# Altium PCB GripperTopBoard.PcbDoc (part 1 of 2)
Units mil, origin at the board's own origin, x right, y up, seen from the top; angles counter-clockwise.
Board outline 3129.83 x 3346.46 mil, 2 copper layers (Top Layer, Bottom Layer), stack 57 mil thick; 36 components, 15 nets, 87 pads, 97 vias.
Unrouted connection lines stored in the file: 53.
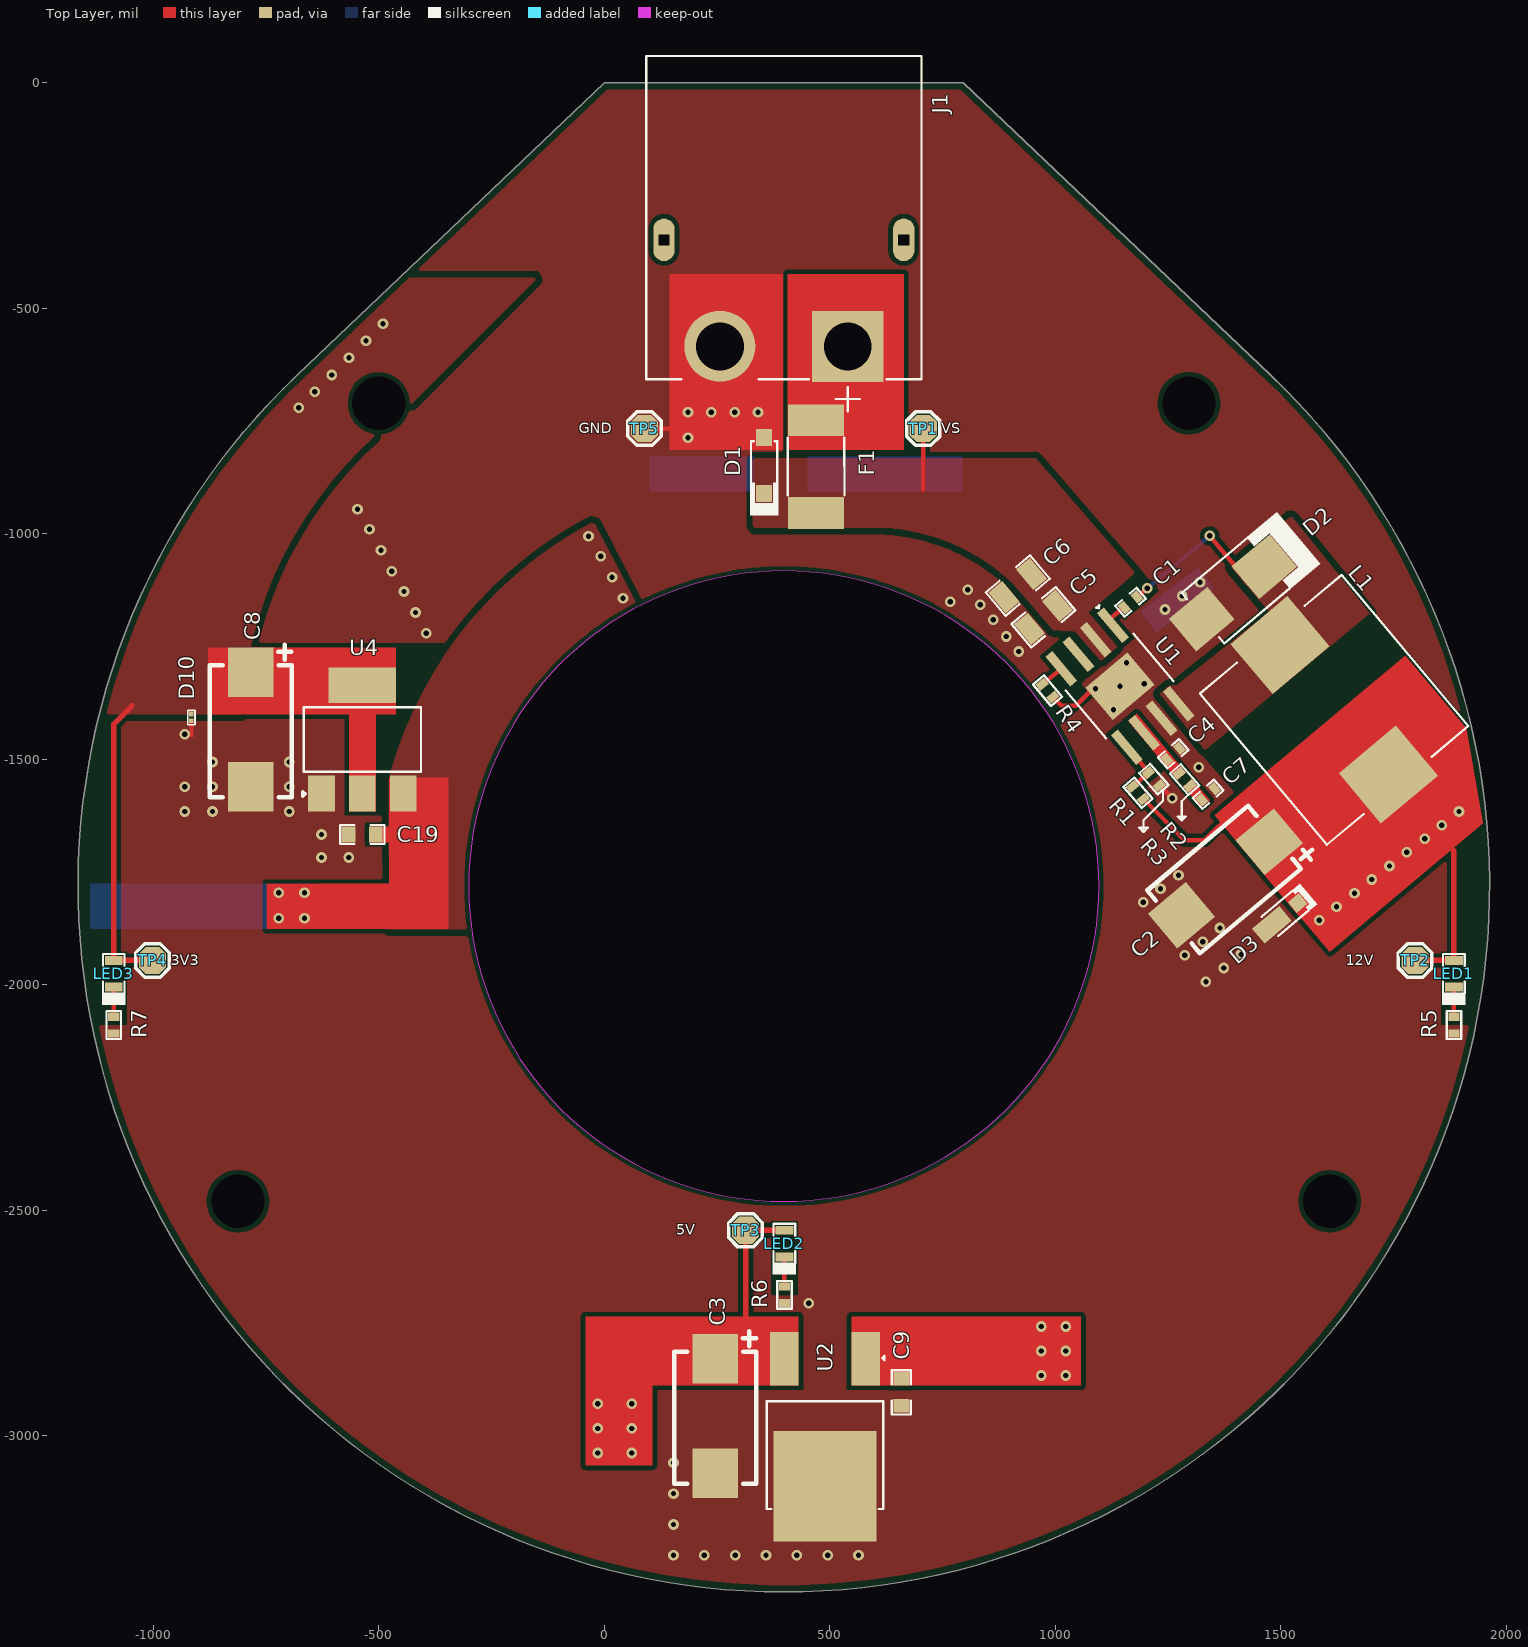
[diagram p0: Top Layer view]
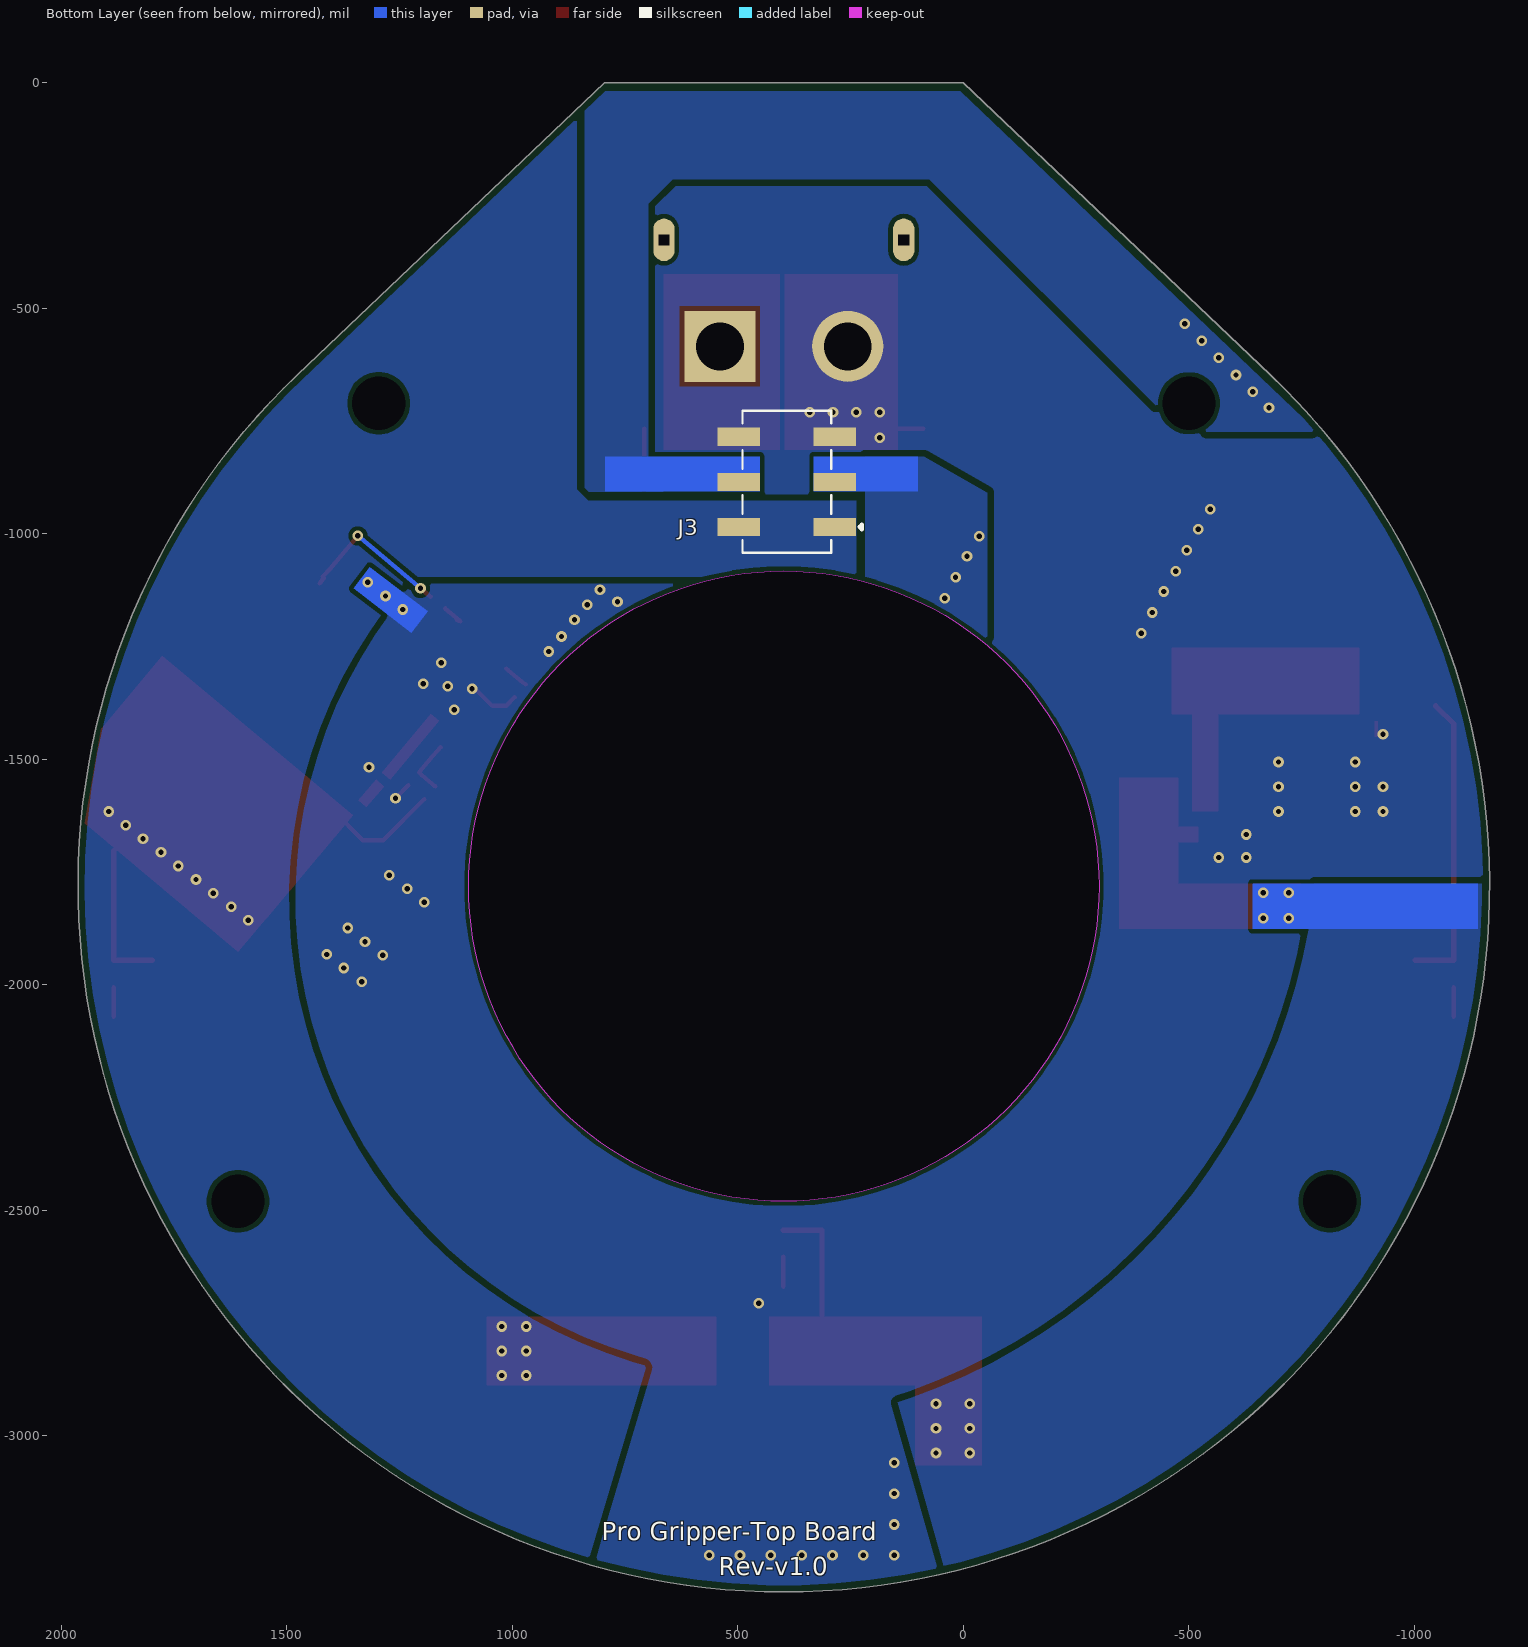
[diagram p1: Bottom Layer view, seen from below]

## Layer stack, top to bottom
Top Solder: solder mask 3, Solder Resist, Dk 3.5
Top Layer: signal copper 10
Dielectric 1: core 37, FR-4, Dk 4.8
Bottom Layer: signal copper 10
Bottom Solder: solder mask 3, Solder Resist, Dk 3.5

## Board outline
-680.82,-647.5 ccw(c397.67,-1781.5) 1476.17,-647.5 795.35,0 0,0
cut-out: -301.15,-1781.5 ccw(c397.67,-1781.5) 397.67,-2480.32 ccw(c397.67,-1781.5) 1096.49,-1781.5 ccw(c397.67,-1781.5) 397.67,-1082.68 ccw(c397.67,-1781.5)

## Design rules (kind name [scope] priority, off if disabled: settings)
BoardOutlineClearance [All] p1: gap=0 ignorepadtopadclearanceinfootprint=FALSE except(15: Poly-OutlineEdge)
Clearance D10 [InComponent('D10')] p1: gap=10 ignorepadtopadclearanceinfootprint=TRUE except(4: Track-SMDPad Track-Fill Track-Poly Track-Region SMDPad-Fill SMDPad-Poly; 15: Poly-Poly)
Clearance [All] p2: gap=10 ignorepadtopadclearanceinfootprint=TRUE except(15: Poly-Poly)
HoleSize [All] p1: absolutevalues=TRUE maxlimit=118.11 minlimit=1 maxpercent=80.000 minpercent=20.000
MinimumSolderMaskSliver [All] p1: minsoldermaskwidth=0
PolygonConnect [All] p1: connectstyle=Direct reliefconductorwidth=10 reliefentries=4 polygonreliefangle="90 Angle" airgapwidth=10
RoutingVias [All] p1: holewidth=11.81 width=23.62 viastyle="Through Hole" minholewidth=11.81 minwidth=23.62 maxholewidth=11.81 maxwidth=23.62
SilkToSilkClearance [All] p1: silktosilkclearance=0
SilkToSolderMaskClearance [IsPad] p1: minsilkscreentomaskgap=0 clearancetoexposedcopper=TRUE
SolderMaskExpansion Via [isvia] p1: expansion=4 istentingtop=TRUE
SolderMaskExpansion [All] p2: expansion=4 istentingtop=FALSE
SupplyNets "Schematic Supply Nets_4" [InNet('VS')] p1: voltage=0.000
SupplyNets "Schematic Supply Nets_3" [InNet('GND')] p2: voltage=0.000
SupplyNets "Schematic Supply Nets_2" [InNet('+3V3')] p3: voltage=0.000
SupplyNets "Schematic Supply Nets_1" [InNet('+5V')] p4: voltage=0.000
SupplyNets "Schematic Supply Nets" [InNet('+12V')] p5: voltage=0.000
UnRoutedNet [All] p1: checkbadconnections=TRUE
Width [All] p1: maxlimit=20 minlimit=10 preferedwidth=10 minimp=50.000000 maximp=50.000000 favimp=50.000000
25 further rules are at their usual default settings.

## Classes and differential pairs
component class U_Connector-Sheet: C J3

## Components (designator, comment, footprint, x,y, rotation, side; value= is the part's Value field where it differs from the comment)
C1 "100nF" cap-0402 1166.41,-1151.97 r220 top
C2 "100uF" Case-E 1473.95,-1682.92 r220 top
C3 "100uF" Case-E 245.99,-2829.37 r270 top
C4 "6.8pF" Cap-0402 1260.99,-1487.92 r221 top
C5 "2.2uF" Cap-0805 973.32,-1185.27 r40 top
C6 "2.2uF" Cap-0805 916.36,-1115.12 r40 top
C7 "3.3nf" Cap-0402 1338.44,-1577.75 r221 top
C8 "100uF" Case-E -784,-1307.46 r270 top
C9 "1uF" Cap-0603 658,-2904 r90 top
C19 "1uF" Cap-0603 -537,-1667 r0 top
D1 "AZ4036-01G" SOD-123 354,-849 r270 top
D2 "SS510B" SMB_ 1393.78,-1131.3 r40 top
D3 "MSMP12A-M3/89A" MicroSMP 1508.5,-1842.94 r40 top
D10 "ESDM2033MX4T5G" DFN-2(0.3x0.6) -915.87,-1407.25 r90 top
F1 "1812L075/48GR" 1812-FUSE 469.41,-851.16 r270 top
J1 "XT60PW-M" XT60PW-M 397.67,-466.54 r270 top locked
J3 "DW254S-22-06-85" "HDR 2x3 (Female SMD 2.54mm)" 390.87,-885 r0 bottom
L1 "22uH" YSPI1040TP-220M 1617.94,-1390.54 r310 top locked
LED1 "RED" LED-0603 1883.47,-1975.69 r270 top
LED2 "RED" LED-0603 399,-2574 r270 top
LED3 "RED" LED-0603 -1088,-1975.69 r270 top
R1 "147K" Res-0402 1182.87,-1574.41 r311 top value=147kR
R2 "28.7K" Res-0402 1286.08,-1545.19 r131 top
R3 "10.5K" Res-0402 1218.05,-1544.18 r131 top
R4 "249K" Res-0402 982.26,-1347.95 r130 top
R5 "1K" Res-0402 1883.47,-2089.5 r270 top
R6 "240R" Res-0402 399,-2687.81 r270 top
R7 "100R" Res-0402 -1088,-2089.5 r270 top
TP1 "TEST POINT" Test-point 706.77,-767.01 r0 top
TP2 "TEST POINT" Test-point 1797.47,-1946.16 r0 top
TP3 "TEST POINT" Test-point 313,-2544.47 r0 top
TP4 "TEST POINT" Test-point -1002,-1946.16 r90 top
TP5 "TEST POINT" Test-point 88.59,-767 r0 top
U1 "TPS54560BQDDARQ1" "8-SO PowerPad" 1143,-1338.3 r310 top
U2 "MC7805BDTRKG" DPAK_ 488.99,-2970.71 r180 top
U4 "LDL1117S33R" "SOT- 223" -537,-1456 r0 top

## Footprints (in the part's own frame and the unit in brackets; to place one, negate y for a bottom-side part, rotate by r counter-clockwise, add the part's x,y. Pads: shape width x height; smd on the part's side, far side on the other; paste and mask are expansions set on the pad)
"8-SO PowerPad" [mm]
  rect 2.2x0.5 smd mask+0.07: 1(-2.875,1.905) 2(-2.875,0.635) 3(-2.875,-0.635) 4(-2.875,-1.905) 5(2.875,-1.905) 6(2.875,-0.635) 7(2.875,0.635) 8(2.875,1.905)
  rect 2.4x3.1 smd mask+0.07: 9(0,0)
  silkscreen extent -4.24,-2.49 1.73,2.49, body extent -3,-2.45 3,2.45, height 1.7
1812-FUSE [mm] "13.2V 2.6A 40A 800mW -40?~+85? 5.2A 10mO 2.5s 50mO 1812 Resettable Fuses ROHS"
  rect 1.78x3.15 smd mask+0.05: 1(-2.615,0) 2(2.615,0)
  silkscreen extent -1.63,-1.6 1.63,1.6, body extent -2.27,-1.62 2.27,1.62, height 0.85
cap-0402 [mil]
  rect 18x25 smd mask+2.36: 1(-18.5,0) 2(18.5,0)
  silkscreen extent -31,-16 31,16, body extent -20,-10 20,10, height 19
Cap-0402 [mil]
  rect 18x25 smd mask+2.36: 1(-18.5,0) 2(18.5,0)
  silkscreen extent -31,-16 31,16, body extent -20,-10 20,10, height 19
Cap-0603 [mil]
  rect 30x35 smd mask+2.36: 1(-30,0) 2(30,0)
  silkscreen extent -49,-21 49,21, body extent -32,-16 31,16, height 34
Cap-0805 [mil] "SMD 0805"
  rect 40x60 smd mask+2.76: 1(-40,0) 2(40,0)
  silkscreen extent -64,-34 64,34, body extent -39,-25 39,25, height 30
Case-E [mm]
  rect 2.79x2.57 smd: 1(0,0) 2(6.44,0)
  silkscreen extent -1.56,-2.31 7.03,2.31, body extent -0.27,-2.21 6.92,2.21, height 2.88
DFN-2(0.3x0.6) [mm]
  rect 0.27x0.26 smd mask+0.05: 1(-0.195,0) 2(0.195,0)
  silkscreen extent -0.41,-0.2 0.41,0.2, body extent -0.3,-0.15 0.3,0.15, height 0.3
DPAK_ [mm]
  rect 1.6x3 smd: 1(-2.285,-3.59) 3(2.285,-3.59)
  rect 5.8x6.2 smd: 2(0,3.59)
  silkscreen extent -3.35,-3.76 3.28,4.88, body extent -3.28,-3.99 3.22,5.92, height 2.51
"HDR 2x3 (Female SMD 2.54mm)" [mm]
  rect 2.4x1.02 smd paste+0 mask+0.05: 1(-2.704,2.54) 2(2.704,2.54) 3(-2.704,0) 4(2.704,0) 5(-2.704,-2.54) 6(2.704,-2.54)
  silkscreen extent -4.23,-4 2.5,4, body extent -3.55,-4.01 3.55,4.01, height 8.9
LED-0603 [mm]
  rect 0.5x1 smd: 1(-0.75,0) 2(0.75,0)
  silkscreen extent -1.12,-0.66 1.75,0.66, body extent -0.82,-0.37 0.82,0.36, height 0.68
MicroSMP [mm]
  rect 2x1.1 smd paste+0 mask+0.051: 1(-0.95,0)
  rect 0.8x0.8 smd paste+0 mask+0.051: 2(0.95,0)
  silkscreen extent -1.09,-0.76 1.75,0.76, body extent -1.25,-0.65 1.25,0.65, height 0.66
Res-0402 [mil]
  rect 18x25 smd mask+2.17: 1(-18.5,0) 2(18.5,0)
  silkscreen extent -32,-17 32,16, body extent -23,-11 23,11, height 16
SMB_ [mm]
  rect 2.8x2.4 smd: 1(-2.3,0) 2(2.3,0)
  silkscreen extent -2.21,-1.91 4.83,1.9, body extent -2.7,-1.8 2.7,1.8, height 2.3
SOD-123 [mm]
  rect 0.95x0.9 smd: 1(-1.575,0) 2(1.575,0)
  silkscreen extent -1.37,-0.8 2.82,0.8, body extent -1.82,-0.78 1.83,0.78, height 1.5
"SOT- 223" [mm]
  rect 1.5x2 smd: 1(-2.3,-3.05) 2(0,-3.05) 3(2.3,-3.05)
  rect 3.8x2 smd: 4(0,3.05)
  silkscreen extent -3.35,-3.2 3.3,1.8, body extent -3.25,-3.5 3.25,3.5, height 1.61
Test-point [mil]
  oct 60x60 smd: 1(0,0)
  silkscreen extent -37,-37 37,37
XT60PW-M [mm]
  rect 4x4 hole 2.7: 1(3,3.6)
  round 4 hole 2.7: 2(3,-3.6)
  oval 2.4x1.2 hole 0.6 square: S1(-3,6.75) S2(-3,-6.75)
  silkscreen extent -13.35,-7.75 6.65,7.75, body extent -13.35,-7.75 4.85,7.75, height 8.4
YSPI1040TP-220M [mm]
  rect 3.7x4.2 smd: 1(-4.75,0) 2(4.75,0)
  silkscreen extent -5.56,-5.2 5.56,5.2, body extent -5.5,-5.15 5.5,5.15, height 3.98

## Part data
C1: library part C1005X7R1H104KT000F, "CAP CER 0.1UF 50V X7R 0402", Dielectric=X7R, LCSC Part Number=C361198, Manufacturer=TDK, Tolerance=10%, Voltage=25V, Category="Ceramic Capacitors", ComponentLink1Description=LCSC, ComponentLink1URL=https://www.lcsc.com/product-detail/Multilayer-Ceramic-Capacitors-MLCC-SMD-SMT_TDK-C1005X7R1H104KT000F_C361198.html, Item Type=Capacitor, Manufacturer Part Number=C1005X7R1H104KT000F, RoHS=No, Supplier 1=Avnet, Supplier Part Number 1=C1005X7R1H104KT000F
C2 C3 C8: library part TAJE107M025RNJ, "CAP TANT 100UF 20% 25V 2917", Case Code (Imperial)=2917, Case Code (Metric)=7343, ESR (Equivalent Series Resistance)=300mR, LCSC Part Number=C7230, Leakage Current=25uA, Manufacturer="Kyocera AVX", Max Operating Temperature=125°C, Min Operating Temperature=-55°C, Package Quantity=1, Supplier Part Number 1=581-TAJE107M025RNJ, Tolerance=20%, Voltage Rating=25V, Capacitance=100uF, Case/Package=2917, Category="Tantalum Capacitors", ComponentLink1Description=https://datasheet.ciiva.com/26787/taje107m025rnj-26787048.pdf?src-supplier=IIIC, ComponentLink1URL=https://datasheet.ciiva.com/26787/taje107m025rnj-26787048.pdf?src-supplier=IIIC, ComponentLink2Description=https://datasheet.ciiva.com/265/taj-265541.pdf?src-supplier=Digi-Key, ComponentLink2URL=https://datasheet.ciiva.com/265/taj-265541.pdf?src-supplier=Digi-Key, ComponentLink3Description=https://datasheet.ciiva.com/265/taj-265542.pdf?src-supplier=Digi-Key, ComponentLink3URL=https://datasheet.ciiva.com/265/taj-265542.pdf?src-supplier=Digi-Key, ComponentLink4Description=https://datasheet.ciiva.com/265/taj-265540.pdf?src-supplier=Digi-Key, ComponentLink4URL=https://datasheet.ciiva.com/265/taj-265540.pdf?src-supplier=Digi-Key, ComponentLink5Description=https://datasheet.ciiva.com/28609/1719052-28609254.pdf?src-supplier=Element14, ComponentLink5URL=https://datasheet.ciiva.com/28609/1719052-28609254.pdf?src-supplier=Element14, ComponentLink6Description=https://datasheet.ciiva.com/11230/taj-11230456.pdf?src-supplier=Avnet, ComponentLink6URL=https://datasheet.ciiva.com/11230/taj-11230456.pdf?src-supplier=Avnet, ComponentLink7Description=https://datasheet.ciiva.com/17339/taj-17339677.pdf?src-supplier=Avnet+Europe, ComponentLink7URL=https://datasheet.ciiva.com/17339/taj-17339677.pdf?src-supplier=Avnet+Europe, ComponentLink8Description=https://datasheet.ciiva.com/22667/1719052-22667581.pdf?src-supplier=Element14, ComponentLink8URL=https://datasheet.ciiva.com/22667/1719052-22667581.pdf?src-supplier=Element14, Construction=Flat, Depth=4.3mm, Dissipation Factor=10%, Features="General Purpose", Height=4.3mm, Height - Seated (Max)=0.169inch, Lead Free="Lead Free", Length=7.3mm, Manufacturer Part Number=TAJE107M025RNJ, Mount="Surface Mount", Number of Pins=2, Packaging="Tape and Reel", Polarity=Polar, Pricing 1="1=2.81000, 10=2.81000, 50=2.81000, 100=2.19000, 1000=1.76000, 10000=1.76000 (USD)", Radiation Hardening=No, REACH SVHC="No SVHC", RoHS=Yes, RoHS Compliant=Yes, Series=TAJ, Stock 1=109, Supplier 1=Mouser, Termination=SMD/SMT, Voltage Rating (DC)=25V, Width=4.3mm
C4: library part CC0402CRNPO9BN6R8, "CAP CER 6.8PF 50V C0G/NPO 0402", Case Code (Imperial)=0402, Case Code (Metric)=1005, Dielectric=C0G, Insulation Resistance=10GR, LCSC Part Number=C189470, Manufacturer=Yageo, Max Operating Temperature=125°C, Min Operating Temperature=-55°C, Supplier Part Number=3247368, Tolerance=2%, Voltage Rating=50V, Case/Package=0402, Category="Ceramic Capacitors", ComponentLink1Description=https://datasheet.ciiva.com/11587/upy-gp-np0-16v-to-50v-8-11587182.pdf?src-supplier=Avnet, ComponentLink1URL=https://datasheet.ciiva.com/11587/upy-gp-np0-16v-to-50v-8-11587182.pdf?src-supplier=Avnet, Construction=Flat, Depth=0.5mm, Height=0.5mm, Item Type=Capacitor, Length=1mm, Manufacturer Part Number=CC0402CRNPO9BN6R8, Mounting Technology="Surface Mount", Packaging="Tape and Reel", Pricing="10000=0.0024, 40000=0.0022, 150000=0.0021, 400000=0.002, 1000000=0.0019 (USD)", Radiation Hardening=No, RoHS=Yes, RoHS Compliant=Yes, Series=CC, Stock=200000, Supplier="Future Electronics", Termination=SMD/SMT, Voltage Rating (DC)=50V, Weight=2.3E-05oz, Width=0.5mm
C5 C6: library part GRM21BD72A225KE01L, "CAP CER 2.2UF 100V X7T 0805", LCSC Part Number=C2981733, Manufacturer=Murata, Supplier Part Number 1=490-GRM21BD72A225KE01LCT-ND, Category="Ceramic Capacitors", ComponentLink1Description=LCSC, ComponentLink1URL=https://www.lcsc.com/product-detail/Multilayer-Ceramic-Capacitors-MLCC-SMD-SMT_Murata-Electronics-GRM21BD72A225KE01L_C2981733.html, Item Type=Capacitor, Manufacturer Part Number=GRM21BD72A225KE01L, Pricing 1="1=0.55000, 10=0.38600, 50=0.29220, 100=0.25440, 500=0.18846, 1000=0.16020 (USD)", RoHS=No, RoHS Compliant=Yes, Stock 1=2439, Supplier 1=Digi-Key
C7: library part CC0402KRX7R9BB332, "CAP CER 3.3nF 50V X7R 0402", Capacitance=3.3nF, Case Code (Imperial)=0402, Case Code (Metric)=1005, Dielectric=X7R, Dielectric Material=Ceramic, Insulation Resistance=100GR, LCSC Part Number=C107028, Manufacturer=Yageo, Max Operating Temperature=125°C, Min Operating Temperature=-55°C, Package Quantity=1, Supplier Part Number 1=9776550, Tolerance=10%, Voltage=50V, Case/Package=0402, Category="Ceramic Capacitors", ComponentLink1Description=https://datasheet.ciiva.com/144/mlccorderingcode-144014.pdf?src-supplier=Digi-Key, ComponentLink1URL=https://datasheet.ciiva.com/144/mlccorderingcode-144014.pdf?src-supplier=Digi-Key, ComponentLink2Description=https://datasheet.ciiva.com/144/mlccorderingcode-144013.pdf?src-supplier=Digi-Key, ComponentLink2URL=https://datasheet.ciiva.com/144/mlccorderingcode-144013.pdf?src-supplier=Digi-Key, ComponentLink3Description=https://datasheet.ciiva.com/144/mlccorderingcode-144015.pdf?src-supplier=Digi-Key, ComponentLink3URL=https://datasheet.ciiva.com/144/mlccorderingcode-144015.pdf?src-supplier=Digi-Key, ComponentLink4Description=https://datasheet.ciiva.com/11786/0900766b80d84f1d-11786153.pdf?src-supplier=Rs, ComponentLink4URL=https://datasheet.ciiva.com/11786/0900766b80d84f1d-11786153.pdf?src-supplier=Rs, ComponentLink5Description=https://datasheet.ciiva.com/7978/1489800-7978103.pdf?src-supplier=Element14, ComponentLink5URL=https://datasheet.ciiva.com/7978/1489800-7978103.pdf?src-supplier=Element14, ComponentLink6Description=https://datasheet.ciiva.com/28450/1489800-28450409.pdf?src-supplier=Element14, ComponentLink6URL=https://datasheet.ciiva.com/28450/1489800-28450409.pdf?src-supplier=Element14, ComponentLink7Description=https://datasheet.ciiva.com/5789/1489800-5789558.pdf?src-supplier=Farnell, ComponentLink7URL=https://datasheet.ciiva.com/5789/1489800-5789558.pdf?src-supplier=Farnell, ComponentLink8Description=https://datasheet.ciiva.com/8033/1489800-8033630.pdf?src-supplier=Element14, ComponentLink8URL=https://datasheet.ciiva.com/8033/1489800-8033630.pdf?src-supplier=Element14, ComponentLink9Description=https://datasheet.ciiva.com/22745/1489800-22745767.pdf?src-supplier=Element14, ComponentLink9URL=https://datasheet.ciiva.com/22745/1489800-22745767.pdf?src-supplier=Element14, ComponentLink10Description=https://datasheet.ciiva.com/5425/upy-gphc-x7r-6-3v-to-50v-8-12304-5425518.pdf?src-supplier=Mouser, ComponentLink10URL=https://datasheet.ciiva.com/5425/upy-gphc-x7r-6-3v-to-50v-8-12304-5425518.pdf?src-supplier=Mouser, ComponentLink11Description=https://datasheet.ciiva.com/11586/upy-gphc-x7r-6-3v-to-50v-8-11586486.pdf?src-supplier=Avnet, ComponentLink11URL=https://datasheet.ciiva.com/11586/upy-gphc-x7r-6-3v-to-50v-8-11586486.pdf?src-supplier=Avnet, ComponentLink12Description=https://datasheet.ciiva.com/15189/getdatasheetpartid-315557-15189133.pdf?src-supplier=Verical, ComponentLink12URL=https://datasheet.ciiva.com/15189/getdatasheetpartid-315557-15189133.pdf?src-supplier=Verical, Depth=0.5mm, Halogen Free="Halogen Free", Height=0.5mm, Item Type=Capacitor, Lead Free="Lead Free", Length=1mm, Manufacturer Part Number=CC0402KRX7R9BB332, Mount="Surface Mount", Number of Pins=2, Packaging="Tape and Reel", Pricing 1="10000=0.00230, 40000=0.00200, 50000=0.00220, 150000=0.00190, 250000=0.00200, 400000=0.00180, 1000000=0.00190, 2500000=0.00180 (USD)", Radiation Hardening=No, Reach SVHC Compliant=Yes, RoHS=Yes, RoHS Compliant=Yes, Series=CC, Stock 1=1190000, Supplier 1="Future Electronics", Terminal Length=0.225mm, Termination=SMD/SMT, Thickness=0.022inch, Voltage Rating=50V, Voltage Rating (DC)=50V, Width=0.02inch
C9 C19: library part CC0603KRX5R8BB105, "CAP CER 1UF 25V X5R 0603", Case Code (Imperial)=0603, Case Code (Metric)=1608, Dielectric=X5R, LCSC Part Number=C14664, Manufacturer=Yageo, Max Operating Temperature=85°C, Min Operating Temperature=-55°C, Package Quantity=1, Supplier Part Number 1=311-1445-1-ND, Tolerance=10%, Voltage Rating=25V, Capacitance=1uF, Case/Package=0603, Category="Ceramic Capacitors", ComponentLink1Description=https://datasheet.ciiva.com/176/mlccorderingcode-176785.pdf?src-supplier=Digi-Key, ComponentLink1URL=https://datasheet.ciiva.com/176/mlccorderingcode-176785.pdf?src-supplier=Digi-Key, ComponentLink2Description=https://datasheet.ciiva.com/176/mlccorderingcode-176786.pdf?src-supplier=Digi-Key, ComponentLink2URL=https://datasheet.ciiva.com/176/mlccorderingcode-176786.pdf?src-supplier=Digi-Key, ComponentLink3Description=https://datasheet.ciiva.com/176/mlccorderingcode-176787.pdf?src-supplier=Digi-Key, ComponentLink3URL=https://datasheet.ciiva.com/176/mlccorderingcode-176787.pdf?src-supplier=Digi-Key, ComponentLink4Description=https://datasheet.ciiva.com/17436/upy-gphc-x5r-4v-to-50v-12-17436952.pdf?src-supplier=Avnet+Europe, ComponentLink4URL=https://datasheet.ciiva.com/17436/upy-gphc-x5r-4v-to-50v-12-17436952.pdf?src-supplier=Avnet+Europe, ComponentLink5Description=https://datasheet.ciiva.com/7978/1525783-7978171.pdf?src-supplier=Element14, ComponentLink5URL=https://datasheet.ciiva.com/7978/1525783-7978171.pdf?src-supplier=Element14, ComponentLink6Description=https://datasheet.ciiva.com/11586/upy-gphc-x5r-4v-to-50v-12-11586318.pdf?src-supplier=Avnet, ComponentLink6URL=https://datasheet.ciiva.com/11586/upy-gphc-x5r-4v-to-50v-12-11586318.pdf?src-supplier=Avnet, Construction=Flat, Depth=0.8mm, Halogen Free="Halogen Free", Height=0.8mm, Item Type=Capacitor, Lead Free="Lead Free", Length=1.6mm, Manufacturer Part Number=CC0603KRX5R8BB105, Mount="Surface Mount", Number of Pins=2, Packaging="Tape and Reel", Pricing 1="1=0.12000, 10=0.08400, 50=0.04760, 100=0.03940, 500=0.02764, 1000=0.02288 (USD)", Radiation Hardening=No, REACH SVHC="No SVHC", RoHS=Yes, RoHS Compliant=Yes, Series=CC, Stock 1=919939, Supplier 1=Digi-Key, Termination=SMD/SMT, Thickness=0.035inch, Voltage Rating (DC)=25V, Width=0.031inch
D1: "Clamp Ipp Tvs Diode Surface Mount SOD-123", LCSC Part Number=-, Manufacturer=Amazing, Package=SOD-123, ComponentLink1Description=Digikey, ComponentLink1URL=https://www.digikey.com/en/products/detail/amazing/AZ4036-01G/16615419, Item Type=Diode, Manufacturer Part Number=AZ4036-01G
D2: "SCHOTTKY DIODE SMB 100V 5A", LCSC Part Number=C3011128, Manufacturer=MDD, Package=SMB, ComponentLink1Description=LCSC, ComponentLink1URL=https://www.lcsc.com/product-detail/Schottky-Barrier-Diodes-SBD_JUXING-SS510B_C3011128.html, Item Type=Diode, Manufacturer Part Number=SS510B
D3: "TVS DIODE 12VWM 19.9VC MICROSMP", LCSC Part Number=C1973858, Max Operating Temperature=150°C, Min Breakdown Voltage=13.3V, Min Operating Temperature=-55°C, Peak Pulse Current=7.5A, Peak Pulse Power=150W, Power Line Protection=No, Reverse Standoff Voltage=12V, Supplier Part Number=78-MSMP12A-M389A, Category="TVS Diodes", ComponentLink1Description=LCSC, ComponentLink2Description=http://www.vishay.com/docs/89457/mspm6a.pdf?src-supplier=Digi-Key, ComponentLink2URL=http://www.vishay.com/docs/89457/mspm6a.pdf?src-supplier=Digi-Key, ComponentLink3Description=http://www.vishay.com/docs/89457/msmp6athrumsmp20a.pdf?src-supplier=Digi-Key, ComponentLink3URL=http://www.vishay.com/docs/89457/msmp6athrumsmp20a.pdf?src-supplier=Digi-Key, Diode Type=ZENER, Item Type="TVS Diode", Mounting Technology="Surface Mount", Number of Unidirectional Channels=1, Packaging="Tape and Reel", Pricing="1=0.36, 10=0.294, 50=0.294, 100=0.118, 1000=0.069, 10000=0.048 (USD)", RoHS=Yes, RoHS Compliant=Yes, Series=TransZorb®, Stock=17037, Supplier=Mouser
D10: "DIODE BIDIR ESD X4DFN2", LCSC Part Number=C896720, Manufacturer="ON Semiconductor", Item Type=(TVS/ESD), Manufacturer Part Number=ESDM2033MX4T5G, Pricing="8961=0.04129, 9000=0.04018, 18000=0.03906, 45000=0.03794, 90000=0.03683, 450000=0.03571, 900000=0.0346 (USD)", RoHS=Yes, Series=-, Stock=629400, Supplier=Avnet
F1: "48V 750mA 40A 1.5A 1812 Resettable Fuses ROHS", LCSC Part Number=C19193053, Manufacturer=LUTE, Package=1812, ComponentLink1Description=LCSC, ComponentLink1URL=https://www.lcsc.com/product-detail/Resettable-Fuses_LUTE-1812L075-48GR_C19193053.html, Item Type=Fuses, Manufacturer Part Number=1812L075/48GR
J1: "Power Connectors ROHS", LCSC Part Number=C98732, Manufacturer="Changzhou Amass Elec", Package=Custom, ComponentLink1Description=LCSC, ComponentLink1URL=https://jlcpcb.com/partdetail/Changzhou_AmassElec-XT60PWM/C98732, Item Type=Connector, Manufacturer Part Number=XT60PW-M
J3: "2.54mm Double Row 6P Standing paste 2x3P SMD,P=2.54mm Female Headers ROHS", LCSC Part Number=C5160818, Manufacturer=DEALON, ComponentLink1Description=LCSC, ComponentLink1URL=https://www.lcsc.com/product-detail/Female-Headers_DEALON-DW254S-22-06-85_C5160818.html, Item Type="Male Header", Manufacturer Part Number=DW254S-22-06-85
L1: library part YSPI1040TP-220M, "6A 22uH Integrated molded inductor ±20% 9A SMD,10.5x10.3mm Power Inductors ROHS", LCSC Part Number=C20417192, Manufacturer=YJYCOIN, Package=SMD,10.5x10.3mm, ComponentLink1Description=LCSC, ComponentLink1URL=https://www.lcsc.com/product-detail/Power-Inductors_YJYCOIN-YSPI1040TP-220M_C20417192.html, Item Type="Power Inductors", Manufacturer Part Number=YSPI1040TP-220M
LED1 LED2 LED3: library part NCD0603R3, "RED LED 0603 Light Emitting Diodes", LCSC Part Number=C3151730, Manufacturer="Foshan NationStar Optoelectronics", Package=0603, ComponentLink1Description=LCSC, ComponentLink1URL=https://www.lcsc.com/product-detail/Light-Emitting-Diodes-LED_Foshan-NationStar-Optoelectronics-NCD0603R3_C3151730.html, Item Type=LED, Manufacturer Part Number=NCD0603R3
R1: library part RC0402FR-07147KL, "RES 147K OHM 1% 1/16W 0402", Case Code (Imperial)=0402, Case Code (Metric)=1005, LCSC Part Number=C163489, Manufacturer=Yageo, Max Operating Temperature=155°C, Max Power Dissipation=63mW, Min Operating Temperature=-55°C, Power Rating=62.5mW, Supplier Part Number=1233261, Temperature Coefficient=100ppm/°C, Tolerance=1%, Voltage Rating=50V, Case/Package=0402, Construction=Rectangular, Depth=0.5mm, Features="Moisture Resistant", Height=0.016inch, Item Type=Resistors, Lead Free=5697LeadFree, Length=1mm, Manufacturer Part Number=RC0402FR-07147KL, Military Standard=Not, Number of Terminations=2, Packaging="Tape and Reel", Pricing="10000=0.0012, 100000=0.0011, 300000=0.001, 750000=0.001, 2000000=0.0009 (USD)", RoHS=Yes, RoHS Compliant=Yes, Series=RC, Stock=30000, Supplier="Future Electronics", Termination=SMD/SMT, Voltage Rating (DC)=50V, Width=0.5mm
R2: library part NQ02WGF2872TCE, "62.5mW 100V ±1% 28.7kΩ 0402 Chip Resistor - Surface Mount ROHS", LCSC Part Number=C2779810, Manufacturer="Royal Ohm", Supplier Part Number=303-NQ02WGF2872TCE, Item Type=Resistor, Manufacturer Part Number=NQ02WGF2872TCE, Pricing="10000=0.002 (USD)", Supplier=Mouser
R3: library part CRCW040210K5FKED, "RES SMD 10.5K OHM 1% 1/16W 0402", LCSC Part Number=C481924, Manufacturer=Vishay, Supplier Part Number=71-CRCW0402-10.5K-E3, Voltage Rating (DC)=50V, ComponentLink1Description=https://datasheet.ciiva.com/11817/0900766b80d98824-11817996.pdf?src-supplier=Rs, ComponentLink1URL=https://datasheet.ciiva.com/11817/0900766b80d98824-11817996.pdf?src-supplier=Rs, ComponentLink2Description=https://datasheet.ciiva.com/3255/dcrcwe3-3255967.pdf?src-supplier=Avnet, ComponentLink2URL=https://datasheet.ciiva.com/3255/dcrcwe3-3255967.pdf?src-supplier=Avnet, ComponentLink3Description=https://datasheet.ciiva.com/22700/1697337-22700669.pdf?src-supplier=Element14, ComponentLink3URL=https://datasheet.ciiva.com/22700/1697337-22700669.pdf?src-supplier=Element14, ComponentLink4Description=https://datasheet.ciiva.com/2463/dcrcwe3-2463739.pdf?src-supplier=Digikey, ComponentLink4URL=https://datasheet.ciiva.com/2463/dcrcwe3-2463739.pdf?src-supplier=Digikey, ComponentLink5Description=https://datasheet.ciiva.com/2463/dcrcwe3-2463740.pdf?src-supplier=Digikey, ComponentLink5URL=https://datasheet.ciiva.com/2463/dcrcwe3-2463740.pdf?src-supplier=Digikey, ComponentLink6Description=https://datasheet.ciiva.com/2463/dcrcwe3-2463741.pdf?src-supplier=Digikey, ComponentLink6URL=https://datasheet.ciiva.com/2463/dcrcwe3-2463741.pdf?src-supplier=Digikey, ComponentLink7Description=https://datasheet.ciiva.com/7743/125364-7743419.pdf?src-supplier=Element14, ComponentLink7URL=https://datasheet.ciiva.com/7743/125364-7743419.pdf?src-supplier=Element14, ComponentLink8Description=https://datasheet.ciiva.com/7663/1697337-7663816.pdf?src-supplier=Element14, ComponentLink8URL=https://datasheet.ciiva.com/7663/1697337-7663816.pdf?src-supplier=Element14, ComponentLink9Description=https://datasheet.ciiva.com/7663/1697337-7663817.pdf?src-supplier=Element14, ComponentLink9URL=https://datasheet.ciiva.com/7663/1697337-7663817.pdf?src-supplier=Element14, ComponentLink10Description=https://datasheet.ciiva.com/16394/dcrcwe3-16394264.pdf?src-supplier=Future+Electronics, ComponentLink10URL=https://datasheet.ciiva.com/16394/dcrcwe3-16394264.pdf?src-supplier=Future+Electronics, ComponentLink11Description=https://datasheet.ciiva.com/16777/70201119-16777227.pdf?src-supplier=Allied+Electronics, ComponentLink11URL=https://datasheet.ciiva.com/16777/70201119-16777227.pdf?src-supplier=Allied+Electronics, Item Type=Resistors, Lead Free=5697LeadFree, Manufacturer Part Number=CRCW040210K5FKED, Pricing="1=0.1, 10=0.017, 50=0.017, 100=0.01, 1000=0.007, 10000=0.004 (USD)", RoHS=Yes, Stock=26970, Supplier=Mouser
R4: library part 0402WGF2493TCE, "62.5mW Thick Film Resistors 50V ±100ppm/℃ ±1% 249kΩ 0402 Chip Resistor - Surface Mount ROHS", LCSC Part Number=C11425, Manufacturer="Royal Electronic Factory", Supplier Part Number=303-0402WGF2493TCE, Item Type=Resistor, Manufacturer Part Number=0402WGF2493TCE, Pricing="10000=0.004 (USD)", RoHS=No, Supplier=Mouser
R5: library part RC0402FR-071KL, "RES 1K OHM 1% 1/16W 0402", Case Code (Imperial)=0402, Case Code (Metric)=1005, LCSC Part Number=C106235, Manufacturer=Yageo, Max Operating Temperature=155°C, Max Power Dissipation=63mW, Min Operating Temperature=-55°C, Power Rating=62.5mW, Resistance=1kR, Resistance Tolerance=1%, Resistor Type="Thick Film", Temperature Coefficient=100ppm/°C, Voltage Rating=50V, Case/Package=0402, Category="Chip SMD Resistors", ComponentLink1Description=https://datasheet.ciiva.com/11819/0900766b80c66297-11819477.pdf?src-supplier=RSComponents, ComponentLink1URL=https://datasheet.ciiva.com/11819/0900766b80c66297-11819477.pdf?src-supplier=RSComponents, ComponentLink2Description=https://datasheet.ciiva.com/7983/1018594-7983502.pdf?src-supplier=Element14, ComponentLink2URL=https://datasheet.ciiva.com/7983/1018594-7983502.pdf?src-supplier=Element14, ComponentLink3Description=https://datasheet.ciiva.com/22747/1018594-22747513.pdf?src-supplier=Element14, ComponentLink3URL=https://datasheet.ciiva.com/22747/1018594-22747513.pdf?src-supplier=Element14, ComponentLink4Description=https://datasheet.ciiva.com/12666/pyu-rc0402-51-rohs-l-6-r-12666741.pdf?src-supplier=Mouser, ComponentLink4URL=https://datasheet.ciiva.com/12666/pyu-rc0402-51-rohs-l-6-r-12666741.pdf?src-supplier=Mouser, ComponentLink5Description=https://datasheet.ciiva.com/7849/1018594-7849869.pdf?src-supplier=Element14, ComponentLink5URL=https://datasheet.ciiva.com/7849/1018594-7849869.pdf?src-supplier=Element14, ComponentLink6Description=https://datasheet.ciiva.com/7849/1018594-7849871.pdf?src-supplier=Element14, ComponentLink6URL=https://datasheet.ciiva.com/7849/1018594-7849871.pdf?src-supplier=Element14, ComponentLink7Description=https://datasheet.ciiva.com/17063/pyu-rc0402-51-rohs-l-6-r-17063193.pdf?src-supplier=Future+Electronics, ComponentLink7URL=https://datasheet.ciiva.com/17063/pyu-rc0402-51-rohs-l-6-r-17063193.pdf?src-supplier=Future+Electronics, Construction=Rectangular, Depth=0.5mm, Features="Moisture Resistant", Height=0.32mm, Item Type=Resistor, Lead Free="Lead Free", Length=1mm, Manufacturer Part Number=RC0402FR-071KL, Military Standard=Not, Number of Pins=2, Number of Terminations=2, Packaging="Tape and Reel", Pricing 1="10000=0.00085, 20000=0.00087, 40000=0.00084, 60000=0.00083, 80000=0.00079, 100000=0.00078, 1000000=0.00076 (USD)", Reach SVHC Compliant=Yes, RoHS=Yes, RoHS Compliant=Yes, Series=RC, Size Code=0402, Stock 1=13030000, Supplier 1=Avnet, Supplier Part Number 1=RC0402FR-071KL, Technology="THICK FILM", Termination=SMD/SMT, Tolerance=1%, Voltage Rating (DC)=50V, Width=0.5mm
R6: library part RC0402FR-07240RL, "RES 240 OHM 1% 1/16W 0402", Case Code (Imperial)=0402, Case Code (Metric)=1005, Manufacturer=Yageo, Max Operating Temperature=155°C, Max Power Dissipation=63mW, Min Operating Temperature=-55°C, Package Quantity=1, Resistance Tolerance=1%, Resistor Type="Thick Film", Supplier Part Number 1=603-RC0402FR-07240RL, Temperature Coefficient=100ppm/°C, Voltage Rating=50V, Case/Package=0402, Category="Chip SMD Resistors", ComponentLink1Description=https://datasheet.ciiva.com/7849/1018594-7849915.pdf?src-supplier=Element14, ComponentLink1URL=https://datasheet.ciiva.com/7849/1018594-7849915.pdf?src-supplier=Element14, ComponentLink2Description=https://datasheet.ciiva.com/7849/1018594-7849916.pdf?src-supplier=Element14, ComponentLink2URL=https://datasheet.ciiva.com/7849/1018594-7849916.pdf?src-supplier=Element14, ComponentLink3Description=https://datasheet.ciiva.com/2519/pyu-r-int-thick-7-2519157.pdf?src-supplier=Digi-Key, ComponentLink3URL=https://datasheet.ciiva.com/2519/pyu-r-int-thick-7-2519157.pdf?src-supplier=Digi-Key, ComponentLink4Description=https://datasheet.ciiva.com/2519/pyu-r-int-thick-7-2519158.pdf?src-supplier=Digi-Key, ComponentLink4URL=https://datasheet.ciiva.com/2519/pyu-r-int-thick-7-2519158.pdf?src-supplier=Digi-Key, ComponentLink5Description=https://datasheet.ciiva.com/2519/pyu-r-int-thick-7-2519156.pdf?src-supplier=Digi-Key, ComponentLink5URL=https://datasheet.ciiva.com/2519/pyu-r-int-thick-7-2519156.pdf?src-supplier=Digi-Key, ComponentLink6Description=https://datasheet.ciiva.com/12669/pyu-rc0402-51-rohs-l-6-r-12669689.pdf?src-supplier=Mouser, ComponentLink6URL=https://datasheet.ciiva.com/12669/pyu-rc0402-51-rohs-l-6-r-12669689.pdf?src-supplier=Mouser, ComponentLink7Description=https://datasheet.ciiva.com/17419/pyu-rc0402-51-rohs-l-6-r-17419482.pdf?src-supplier=Future+Electronics, ComponentLink7URL=https://datasheet.ciiva.com/17419/pyu-rc0402-51-rohs-l-6-r-17419482.pdf?src-supplier=Future+Electronics, Construction=Rectangular, Depth=0.5mm, Features="Moisture Resistant", Height=0.016inch, Lead Free="Lead Free", Length=1mm, Manufacturer Part Number=RC0402FR-07240RL, Military Standard=Not, Number of Terminations=2, Packaging="Tape and Reel", Power Rating=63mW, Pricing 1="1=0.10000, 10=0.01200, 50=0.01200, 100=0.00500, 1000=0.00300, 10000=0.00100 (USD)", REACH SVHC=Unknown, Resistance=240R, RoHS=Yes, RoHS Compliant=Yes, Series=RC, Size Code=0402, Stock 1=1903202, Supplier 1=Mouser, Termination=SMD/SMT, Tolerance=1%, Voltage Rating (DC)=50V, Width=0.02inch
R7: library part RC0402FR-07100RL, "RES 100 OHM 1% 1/16W 0402", Case Code (Imperial)=0402, Case Code (Metric)=1005, LCSC Part Number=C106232, Manufacturer=Yageo, Max Operating Temperature=155°C, Max Power Dissipation=63mW, Min Operating Temperature=-55°C, Power Rating=62.5mW, Resistance Tolerance=1%, Resistor Type="Thick Film", Supplier Part Number 1=603-RC0402FR-07100RL, Temperature Coefficient=100ppm/°C, Voltage Rating=50V, Case/Package=0402, Category="Chip SMD Resistors", ComponentLink1Description=https://datasheet.ciiva.com/11808/0900766b80c66297-11808765.pdf?src-supplier=RSComponents, ComponentLink1URL=https://datasheet.ciiva.com/11808/0900766b80c66297-11808765.pdf?src-supplier=RSComponents, ComponentLink2Description=https://datasheet.ciiva.com/7849/1784430-7849810.pdf?src-supplier=Element14, ComponentLink2URL=https://datasheet.ciiva.com/7849/1784430-7849810.pdf?src-supplier=Element14, ComponentLink3Description=https://datasheet.ciiva.com/28367/1018594-28367226.pdf?src-supplier=Element14, ComponentLink3URL=https://datasheet.ciiva.com/28367/1018594-28367226.pdf?src-supplier=Element14, ComponentLink4Description=https://datasheet.ciiva.com/22747/1018594-22747511.pdf?src-supplier=Element14, ComponentLink4URL=https://datasheet.ciiva.com/22747/1018594-22747511.pdf?src-supplier=Element14, ComponentLink5Description=https://datasheet.ciiva.com/12667/pyu-rc0402-51-rohs-l-6-r-12667957.pdf?src-supplier=Mouser, ComponentLink5URL=https://datasheet.ciiva.com/12667/pyu-rc0402-51-rohs-l-6-r-12667957.pdf?src-supplier=Mouser, ComponentLink6Description=https://datasheet.ciiva.com/15189/getdatasheetpartid-329466-15189335.pdf?src-supplier=Verical, ComponentLink6URL=https://datasheet.ciiva.com/15189/getdatasheetpartid-329466-15189335.pdf?src-supplier=Verical, ComponentLink7Description=https://datasheet.ciiva.com/16740/pyu-rc0402-51-rohs-l-6-r-16740566.pdf?src-supplier=Future+Electronics, ComponentLink7URL=https://datasheet.ciiva.com/16740/pyu-rc0402-51-rohs-l-6-r-16740566.pdf?src-supplier=Future+Electronics, Construction=Rectangular, Depth=0.5mm, Features="Moisture Resistant", Height=0.32mm, Item Type=Resistor, Lead Free="Lead Free", Length=1mm, Manufacturer Part Number=RC0402FR-07100RL, Military Standard=Not, Number of Pins=2, Number of Terminations=2, Packaging="Tape and Reel", Pricing 1="1=0.10000, 10=0.01200, 50=0.01200, 100=0.00500, 1000=0.00300, 2500=0.00200, 10000=0.00100 (USD)", REACH SVHC="No SVHC", Resistance=100R, RoHS=Yes, RoHS Compliant=Yes, Series=RC, Size Code=0402, Stock 1=699545, Supplier 1=Mouser, Technology="THICK FILM", Termination=SMD/SMT, Tolerance=1%, Voltage Rating (DC)=50V, Width=0.5mm
TP1 TP2 TP3 TP4 TP5: "Test Point ON", Item Type="TEST POINT"
U1: "IC REG BCK SPLIT RAIL ADJ 8SOPWR", LCSC Part Number=C2072188, Manufacturer="Texas Instruments", Max Supply Voltage=60V, Min Supply Voltage=4.5V, Nominal Supply Current=146uA, Supplier Part Number=595-TPS54560BQDDARQ1, ComponentLink1Description=http://www.ti.com/lit/ds/symlink/tps54560b-q1.pdf?src-supplier=Digikey, ComponentLink1URL=http://www.ti.com/lit/ds/symlink/tps54560b-q1.pdf?src-supplier=Digikey, Height=1.7mm, Item Type=IC, Length=4.89mm, Manufacturer Part Number=TPS54560BQDDARQ1, Pricing="1=6.41, 10=5.44, 50=5.44, 100=4.7, 1000=3.4, 10000=3.29 (USD)", RoHS=Yes, Stock=1171, Supplier=Mouser, Thickness=1.48mm, Width=3.9mm
U2: "IC REG LINEAR 5V 1A DPAK", LCSC Part Number=C110908, Manufacturer=onsemi, Package=TO-252-2(DPAK), ComponentLink1Description=LCSC, ComponentLink1URL=https://www.lcsc.com/product-detail/Linear-Voltage-Regulators-LDO_onsemi-MC7805BDTRKG_C110908.html, Item Type=Regulator, Manufacturer Part Number=MC7805BDTRKG
U4: "IC REG LINEAR 3.3V 1.2A SOT223", Case/Package=TO-261-4, Dropout Voltage=600mV, LCSC Part Number=C435835, Manufacturer=STMicroelectronics, Max Input Voltage=18V, Max Operating Temperature=125°C, Min Operating Temperature=-40°C, Min Output Voltage=3.3V, Output Current=1.2A, Power Supply Rejection Ratio (PSRR)=65dB, Quiescent Current=500uA, Supplier Part Number 1=497-17239-6-ND, ComponentLink1Description=LCSC, ComponentLink1URL=https://www.lcsc.com/product-detail/Linear-Voltage-Regulators-LDO_STMicroelectronics-LDL1117S33R_C435835.html, Item Type=IC, Manufacturer Part Number=LDL1117S33R, Mount="Surface Mount", Number of Regulators=1, Output Configuration=Positive, Output Type=Fixed, Packaging="Tape and Reel", Pricing 1="1=0.45, 10=0.362, 100=0.2465, 500=0.1849, 1000=0.13867 (USD)", Stock 1=13064, Supplier 1=Digi-Key

## Free pads (board coordinates)
  round 0 hole 118.11 unplated: MH1(1296.06,-710.84) MH2(-500.71,-710.84) MH3(1608.06,-2480.32) MH4(-812.72,-2480.32)

## Via types
v1: diameter 23.62, hole 11.81, Top Layer to Bottom Layer, tented both sides, 97 vias

## Nets (pads, with @x,y where several pads share a name; then routed paths per layer and width w, separated by ;. In a path a pad name is that pad's centre, name@x,y a point inside that pad or via, vN(x,y) a via of type N, cw(c..) or ccw(c..) an arc to the next point about the centre after c; other vN are vias at no path point)
+3V3: C8.1 D10.2 J3.4 LED3.1 TP4.1 U4.2 U4.4 | length 769.4
  Top Layer w12: -1047.78,-1381.67 -1088,-1421.89 LED3.1 TP4.1 ; -773.43,-1381.85 -701.11,-1309.53
  other v1: -678.01,-721.01 -642.36,-685.36 -605,-648 -566.64,-609.64 -528.9,-571.9 -491.15,-534.15
+5V: C3.1 C19.2 J3.3 LED2.1 TP3.1 U2.3 U4.3 | length 311.8
  Top Layer w12: 313,-2770.32 TP3.1 LED2.1
  other v1: -14.83,-3038.37 60.17,-3038.37 -14.83,-2983.87 60.17,-2983.87 -14.83,-2929.37 60.17,-2929.37 -722,-1853 -665,-1853 -722,-1796 -665,-1796 40.95,-1143.15 16.85,-1096.73 -8.57,-1050.29 -35.44,-1005.39
+12V: C2.1 C9.2 D3.2 J3.1 J3.2 L1.2 LED1.1 R1.2 TP2.1 U2.1 | length 835.2
  Top Layer w10: R1.2 1286.1,-1679.47 1331.27,-1679.47 1393.74,-1617 1411,-1617 ; v1@1818.48,-1684.48 v1(1818.48,-1676.34)
  Top Layer w12: TP2.1 LED1.1 1883.47,-1703.41 1815.34,-1635.29 1815.34,-1562.65 1850.52,-1527.47
  other v1: 968.79,-2866.43 1023,-2866.43 968.79,-2812.21 1023,-2812.21 968.79,-2758 1023,-2758 1585.04,-1857.37 1623.15,-1827.2 1662.85,-1797.03 1700.96,-1766.86 1740.66,-1736.68 1778.78,-1706.51 1856.59,-1646.17 1894.7,-1616
FB: R1.1 R3.2 U1.5 | length 120.8
  Top Layer w10: U1.5 1183.71,-1501.9 1204.24,-1526.37 R3.2 1200.23,-1535.1 1176.54,-1555.69 R1.1
GND: C2.2 C3.2 C4.1 C5.1 C6.1 C7.1 C8.2 C9.1 C19.1 D1.1 D2.1 D3.1 D10.1 J1.2 J3.5 J3.6 R3.1 R4.1 R5.2 R6.2 R7.2 TP5.1 U1.7 U1.9 U2.2 U4.1 | length 253.6
  Top Layer w10: v1(-931,-1445) v1@-926.44,-1440.44 ; TP5.1 177.2,-767 ; R4.1 1013.36,-1381.34 1044.59,-1381.34 1082.29,-1343.64 v1(1088.92,-1343.64) ; R3.1 1230.46,-1558.14 1258.61,-1586.29 v1(1258.61,-1586.36)
  other v1: 152.91,-3265.18 221.32,-3265.18 289.72,-3265.18 358.13,-3265.18 426.54,-3265.18 494.94,-3265.18 563.35,-3265.18 152.91,-3196.78 152.91,-3128.37 152.91,-3059.96 453,-2706.31 1333.56,-1993.22 1373.26,-1963.05 1286.79,-1934.64 1411.37,-1932.88 1326.49,-1904.47 1364.6,-1874.3 1194.84,-1817.49 1232.95,-1787.32 1272.65,-1757.14 -627.55,-1718 -567,-1718 -627.55,-1667 -931,-1615.92 -869,-1615.92 -699,-1615.92 -931,-1561 -869,-1561 -699,-1561 1317.44,-1517.62 -869,-1506.08 -699,-1506.08 1128.48,-1390.66 1143,-1338.3 1197.07,-1332.95 1157.52,-1285.94 918.66,-1261.14 890.5,-1227.97 -395,-1221 861.7,-1190.99 -419.1,-1174.58 1242.71,-1168.18 833.54,-1157.82 766.47,-1150.7 1280.82,-1138 -444.52,-1128.15 805.38,-1124.65 1320.52,-1107.83 -471.39,-1083.24 -495.49,-1036.82 -520.92,-990.38 -547.79,-945.48 185.26,-787.4 185.26,-731 237,-731 288.74,-731 340.49,-731
NetC1_1: C1.1 D2.2 L1.1 U1.8 | length 345.2
  Top Layer w10: C1.1 1183.81,-1137.71 v1(1203.46,-1121.22) ; v1(1342.19,-1004.81) 1403.43,-1077.8 D2.2@1420.55,-1095.13 ; D2.2@1417.44,-1097.4 D2.2@1426.18,-1109.38
  Bottom Layer w10: v1(1203.46,-1121.22) v1(1342.19,-1004.81)
NetC1_2: C1.2 U1.1 | length 48.7
  Top Layer w10: U1.1@1114.66,-1194.41 C1.2@1148.69,-1165.85 ; U1.1@1119.63,-1192.85 U1.1@1122.93,-1190.17
NetC4_2: C4.2 R2.2 U1.6
NetC7_2: C7.2 R2.1
NetF1_1: F1.1 J1.1
NetLED1_2: LED1.2 R5.1 | length 65.8
  Top Layer w10: R5.1 LED1.2
NetLED2_2: LED2.2 R6.1 | length 65.8
  Top Layer w10: R6.1 LED2.2
NetLED3_2: LED3.2 R7.1 | length 65.8
  Top Layer w10: R7.1 LED3.2
NetR4_2: R4.2 U1.4 | length 54.4
  Top Layer w10: R4.2 976.84,-1329.82 1009.01,-1302.83 U1.4
VS: C5.2 C6.2 D1.2 F1.2 TP1.1 U1.2 | length 136
  Top Layer w10: 706.77,-903 TP1.1
pads on no net: J1.S1 J1.S2 U1.3

## Polygon pours and split planes (outlines as drawn)
GND on Top Layer "NONET_L-01_P-001" (solid, remove dead copper, pour order 10): -680.82,-647.5 ccw(c397.67,-1781.5) 1476.17,-647.5 795.35,0 0,0
VS on Top Layer "NONET_L-01_P-001" (solid, pour order 0): 956.09,-833.26 1176.96,-1087.25 1072.42,-1174.56 1137,-1250.89 1101.22,-1282.52 1043.94,-1217.23 994.52,-1214.18 904.71,-1109.36 ccw(c595.98,-1435.17) 646.34,-989.15 329.14,-989.15 329.14,-833.26
+3V3 on Top Layer "NONET_L-01_P-001" (solid, pour order 8): -1120.22,-1400.58 cw(c397.67,-1781.49) -680.82,-647.5 -455,-432.73 -147.73,-432.73 -448.78,-733.78 ccw(c91.7,-1452.41) -806,-1400.58
+5V on Top Layer "NONET_L-01_P-001" (solid, pour order 4): -271.14,-1546 -271.41,-1877 -477.42,-1877 -478.72,-1546 cw(c393.95,-1772.52) -23.49,-973.4 69.45,-1152.22 ccw(c396.29,-1777.75) -270.35,-1546
NetC1_1 on Top Layer "NONET_L-01_P-001" (solid, pour order 1): 1231.12,-1355.37 1287.31,-1425.34 1331.93,-1480.4 1697.11,-1176.14 1522.5,-961.23 1390.49,-1075.07 1474.08,-1173.23 1270.25,-1335.37 1252.62,-1337.33
GND on Bottom Layer "NONET_L-01_P-001" (solid, pour order 11): -680.82,-647.5 ccw(c397.67,-1781.5) 1476.17,-647.5 795.35,0 0,0
+5V on Bottom Layer "NONET_L-01_P-001" (solid, pour order 9): 216.81,-1106.49 130.25,-1135.87 ccw(c167.41,-1249.52) 108.77,-1145.31 ccw(c146.06,-1257.01) 87.68,-1154.74 ccw(c132.12,-1262.8) 67.44,-1165.5 ccw(c117.12,-1268.61) 48.26,-1177.18 -53.65,-1239.28 -53.65,-909 86,-829 216.81,-829
+12V on Bottom Layer "NONET_L-01_P-001" (solid, pour order 5): 857,-578.5 857,-902 831.64,-927.36 237.17,-927.36 237.17,-1096 1223.72,-1096 cw(c422.59,-1809.51) 702.62,-2845.12 833.26,-3284.61 1010.44,-3221.5 1181.82,-3135.83 1341.1,-3030.12 1490.77,-2906.37 1604.64,-2779.86 1671.78,-2690.3 1724.72,-2611.55 1810.39,-2458.73 1869.89,-2320.92 1914.29,-2174.07 1960.71,-1948.42 1962.98,-1649.07 1910.86,-1382.28 1842.39,-1174.33 1749.75,-988.3 1619,-799.67 1518.92,-688.15 1285.23,-465.9 885.77,-86 857,-86
+3V3 on Bottom Layer "NONET_L-01_P-001" (solid, pour order 6): 839,-907 839,-19 5.95,-19 -785.07,-774 -485,-774 75,-214 644,-214 698,-268 698,-868 659,-907
+5V on Bottom Layer "NONET_L-01_P-001" (solid, pour order 3): 43.04,-3288.71 cw(c398.44,-1781.44) -1150.16,-1775.88 -780,-1775.88 ccw(c562.76,-1642.94) 145.53,-2926.14

## Other copper
Top Layer:
  rectangle net GND: -938.67,-1450.78 -911.64,-1444.27
  rectangle net GND: -920.01,-1444.27 -911.64,-1414.79
  rectangle net +12V: 547.45,-2888.43 1057,-2736
  rectangle net +5V: -42,-3066.37 106.3,-2736
  rectangle net +3V3: -566.53,-1615.45 -507,-1255.84
  rectangle net +5V: -749,-1877 -346,-1776.08
  rectangle net +5V: -522,-1684.5 -346,-1649.5
  rectangle net +5V: -477.42,-1877 -346,-1541
  rectangle net +5V: -42,-2888.43 430.52,-2736
  region net +12V: 1882.43,-1653.97 1948.03,-1642.58 1911.27,-1430.95 1845.66,-1442.34
  region net +12V: 1850.52,-1527.47 1511.11,-1812.22 1607.88,-1927.56 1947.29,-1642.82
  region net +12V: 1607.88,-1927.57 1754.33,-1803.89 1498.6,-1501.06 1352.15,-1624.74
  rectangle net +3V3: -879,-1400.69 -462.2,-1252.54
  region net NetC7_2: 1301.75,-1544.16 1282.88,-1560.54 1323.49,-1607.31 1342.36,-1590.92
  region net NetC4_2: 1270.42,-1546.22 1289.64,-1530.25 1180.18,-1398.48 1160.95,-1414.46
  region net +12V: 1920.84,-1536.86 1839.22,-1439.56 1462.21,-1755.86 1543.83,-1853.15
  region net +12V: 1487.69,-1786.3 1911.27,-1430.95 1775.72,-1269.38 1352.15,-1624.74
  rectangle net GND: 144.54,-814 396,-424
  rectangle net NetF1_1: 406.05,-814 663.99,-424
  pour cut-out: 1127.51,-1431.11 1222.84,-1540.18 1256.68,-1512.11 1162.2,-1402.24
  pour cut-out: 965.78,-1373.95 1010.26,-1424.84 1083.78,-1363.84 1039.63,-1312.5
  pour cut-out: 978.32,-1259.02 1047.95,-1338.68 1077.85,-1313.87 1008.84,-1233.63
  pour cut-out: 1153.16,-1106.28 1196.07,-1155.37 1230.4,-1126.89 1187.85,-1077.42
  pour cut-out: -1117.69,-1926.32 -1117.69,-2089.5 -1058.32,-2089.5 -1058.32,-1926.32
  pour cut-out: 1853.78,-1926.31 1853.78,-2089.5 1913.15,-2089.5 1913.15,-1926.31
  pour cut-out: 369.31,-2524.63 369.31,-2687.81 428.68,-2687.81 428.68,-2524.63
  pour cut-out: -637.69,-1242.34 -486,-1242 -353.78,-1242.34 -449.45,-1410.89 -637.69,-1410.89
  pour cut-out: 1322.16,-1488.37 1396.85,-1573.83 1777.54,-1257.98 1703.08,-1171.4
Bottom Layer:
  region net GND: 1223.42,-1219.97 1352.36,-1121.23 1315.88,-1073.6 1186.94,-1172.33
  rectangle net +3V3: 450.08,-907 794,-829
  rectangle net +5V: 100,-907 331.65,-829
  rectangle net +5V: -1141,-1876.94 -641.08,-1775.88

## Silkscreen, mask and mechanical layers (free items; w line width, h text height)
Top Overlay:
  lines w5: 1238.39,-1567.57 1238.39,-1592.31 1195.24,-1635.47 1195.24,-1661.42 ; 1279.93,-1627.26 1271.23,-1627.26 1279.97,-1636 ; 1280.01,-1627.26 1288.71,-1627.26 1279.97,-1636 ; 1294.34,-1579.08 1279.97,-1593.45 1279.97,-1636 ; 1195.24,-1661.42 1185.64,-1651.82 1195.24,-1651.82 1204.83,-1651.82 1195.24,-1661.42
  text "GND" at -57.35,-785.28 h40
  text "VS" at 746.96,-785.28 h40
  text "3V3" at -961.5,-1964.12 h40
  text "12V" at 1643.5,-1964.27 h40
  text "5V" at 159.32,-2562.59 h40
Bottom Overlay:
  text "Pro Gripper-Top Board" at 801.09,-3231.62 h39.37
  text "Rev-v1.0" at 541.98,-3309.68 h39.37
Board Outline:
  circle w0.5: c1608.06,-2480.32 r59.06
  circle w10: c397.67,-1781.5 r698.82
  circle w0.5: c1296.06,-710.84 r59.06
  circle w0.5: c-812.72,-2480.32 r59.06
  circle w0.5: c-500.71,-710.84 r59.06
  lines w10: -680.82,-647.5 ccw(c397.67,-1781.5) 1476.17,-647.5 795.35,0 0,0 -680.82,-647.5
Fabrication:
  drawing of 191 lines, arcs and shapes, not listed
  text "Layer" at 2093.74,85 h60
  text "Name" at 2503.65,85 h60
  text "Material" at 3433.4,85 h60
  text "Thickness" at 4293.16,85 h60
  text "Constant" at 4943,85 h60
  text "Board Layer Stack" at 5512.86,85 h60
  text "Top Overlay" at 2503.65,-35 h60
  text "Top Solder" at 2503.65,-155 h60
  text "Solder Resist" at 3433.4,-155 h60
  text "0.076mm" at 4293.16,-155 h60
  text "3.5" at 4943,-155 h60
  text "1" at 2093.74,-275 h60
  text "Top Layer" at 2503.65,-275 h60
  text "0.254mm" at 4293.16,-275 h60
  text "Dielectric 1" at 2503.65,-395 h60
  text "FR-4" at 3433.4,-395 h60
  text "0.940mm" at 4293.16,-395 h60
  text "4.8" at 4943,-395 h60
  text "2" at 2093.74,-515 h60
  text "Bottom Layer" at 2503.65,-515 h60
  text "0.254mm" at 4293.16,-515 h60
  text "Bottom Solder" at 2503.65,-635 h60
  text "Solder Resist" at 3433.4,-635 h60
  text "0.076mm" at 4293.16,-635 h60
  text "3.5" at 4943,-635 h60
  text "Bottom Overlay" at 2503.65,-755 h60
  text "Total board thickness:" at 2093.74,-875 h60
  text "1.600mm" at 4293.16,-875 h60
Drill Drawing:
  circle w10: c-1013.38,1153.27 r33.33
  lines w10: -1046.71,1036.61 -980.04,1036.61 -1013.38,969.94 -1046.71,1036.61 ; -1046.71,1286.61 -1030.04,1286.61 -1013.38,1269.94 -996.71,1286.61 -980.04,1286.61 -996.71,1303.27 -980.04,1319.94 -996.71,1319.94 -1013.38,1336.61 -1030.04,1319.94 -1046.71,1319.94 -1030.04,1303.27 -1046.71,1286.61 ; -1046.71,1419.94 -980.04,1419.94 -980.04,1486.61 -1046.71,1486.61 -1046.71,1419.94
  lines w15: -1106.5,924.94 9974.4,924.94 ; -1106.5,1524.94 9974.4,1524.94 ; -555.62,774.94 -555.62,1674.94 ; 34.22,774.94 34.22,1674.94 ; 1183.88,774.94 1183.88,1674.94 ; 1689.76,774.94 1689.76,1674.94 ; 2423.56,774.94 2423.56,1674.94 ; 3923.11,774.94 3923.11,1674.94 ; 4512.96,774.94 4512.96,1674.94 ; 5258.76,774.94 5258.76,1674.94 ; 6408.42,774.94 6408.42,1674.94 ; 7262.19,774.94 7262.19,1674.94 ; 8595.79,774.94 8595.79,1674.94 ; -1106.5,774.94 9974.4,774.94 9974.4,1674.94 -1106.5,1674.94 -1106.5,774.94
  text "Symbol" at -1016.5,1569.94 h72
  text "Count" at -510.62,1569.94 h72
  text "Hole Size" at 79.22,1569.94 h72
  text "Plated" at 1228.88,1569.94 h72
  text "Hole Type" at 1734.76,1569.94 h72
  text "Drill Layer Pair" at 2468.56,1569.94 h72
  text "Via/Pad" at 3968.11,1569.94 h72
  text "Pad Shape" at 4557.96,1569.94 h72
  text "Template" at 5303.76,1569.94 h72
  text "Description" at 6453.42,1569.94 h72
  text "Hole Tolerance (+)" at 7307.19,1569.94 h72
  text "Hole Tolerance (-)" at 8640.79,1569.94 h72
  text "2" at -510.62,1419.94 h60
  text "0.600mm (23.62mil)" at 79.22,1419.94 h60
  text "PTH" at 1228.88,1419.94 h60
  text "Rectangle" at 1734.76,1419.94 h60
  text "Top Layer - Bottom Layer" at 2468.56,1419.94 h60
  text "Pad" at 3968.11,1419.94 h60
  text "Rounded" at 4557.96,1419.94 h60
  text "r240_120h60_170r60" at 5303.76,1419.94 h60
  text "2" at -510.62,1269.94 h60
  text "2.700mm (106.30mil)" at 79.22,1269.94 h60
  text "PTH" at 1228.88,1269.94 h60
  text "Round" at 1734.76,1269.94 h60
  text "Top Layer - Bottom Layer" at 2468.56,1269.94 h60
  text "Pad" at 3968.11,1269.94 h60
  text "(Mixed)" at 4557.96,1269.94 h60
  text "(Mixed)" at 5303.76,1269.94 h60
  text "4" at -510.62,1119.94 h60
  text "3.000mm (118.11mil)" at 79.22,1119.94 h60
  text "NPTH" at 1228.88,1119.94 h60
  text "Round" at 1734.76,1119.94 h60
  text "Top Layer - Bottom Layer" at 2468.56,1119.94 h60
  text "Pad" at 3968.11,1119.94 h60
  text "Rounded" at 4557.96,1119.94 h60
  text "c0hn300" at 5303.76,1119.94 h60
  text "97" at -510.62,969.94 h60
  text "0.300mm (11.81mil)" at 79.22,969.94 h60
  text "PTH" at 1228.88,969.94 h60
  text "Round" at 1734.76,969.94 h60
  text "Top Layer - Bottom Layer" at 2468.56,969.94 h60
  text "Via" at 3968.11,969.94 h60
  text "Rounded" at 4557.96,969.94 h60
  text "v60h30" at 5303.76,969.94 h60
  text "105 Total" at -510.62,819.94 h60
  text "Slot definitions :" at -1016.5,674.97 h60
  text "Routed Path Length" at 16.19,674.97 h60
  text "= Calculated from tool start centre position to tool end centre position." at 1118.86,674.97 h60
  text "Hole Length" at 16.19,574.99 h60